# Altium PCB Commodore CPM Modul.PcbDoc (part 2 of 2)
Units mm, origin at the board's own origin, x right, y up, seen from the top; angles counter-clockwise.
Board outline 105.5 x 129.25 mm, 2 copper layers (Top Layer, Bottom Layer), stack 1.569 mm thick; 51 components, 93 nets, 364 pads, 127 vias.
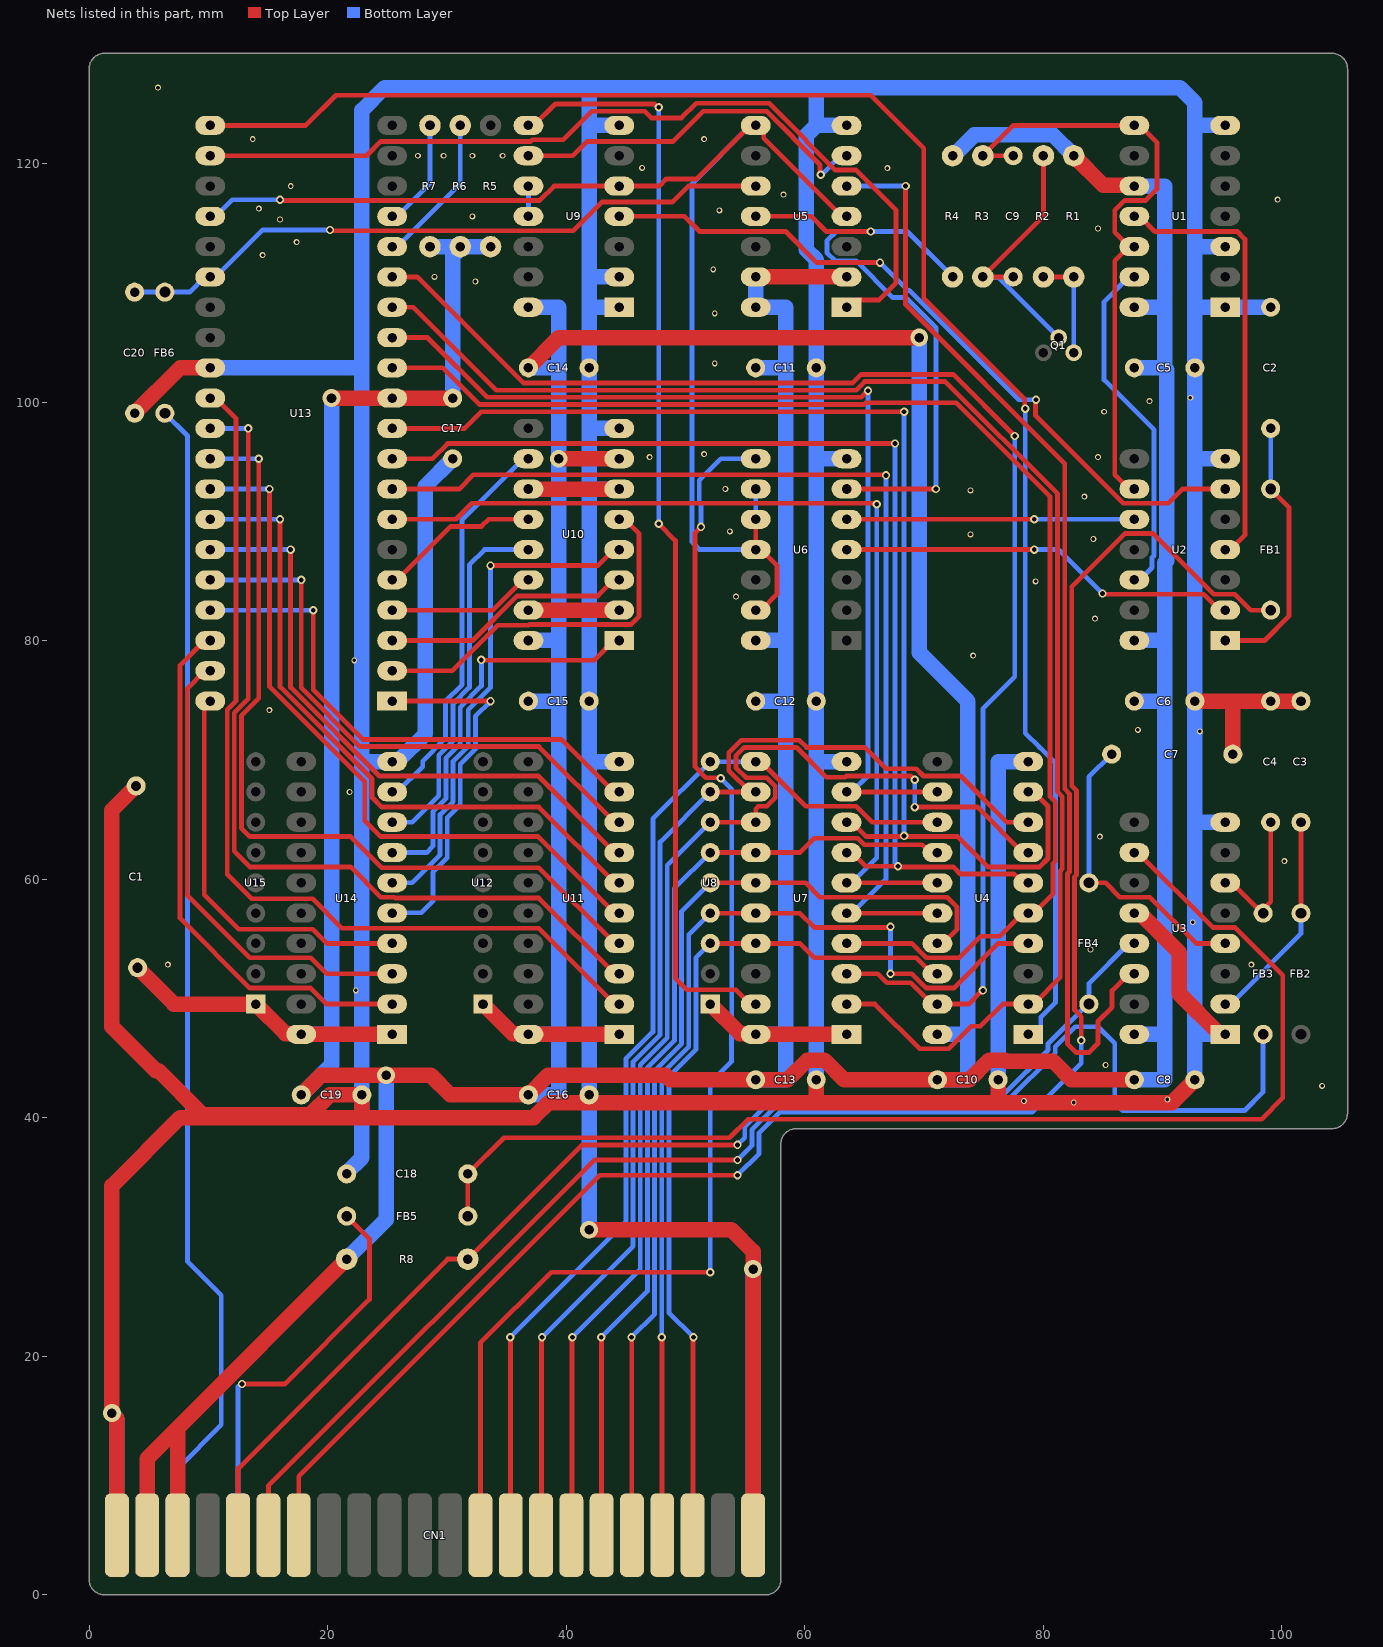
[diagram p2: the nets of this part, all layers, seen from the top]

## Via types
v1: diameter 0.7, hole 0.4, Top Layer to Bottom Layer, tented both sides, 63 vias
v2: diameter 0.5, hole 0.3, Top Layer to Bottom Layer, tented both sides, 57 vias
v3: diameter 1.5, hole 0.8, Top Layer to Bottom Layer, tented both sides, 7 vias

## Nets (pads, with @x,y where several pads share a name; then routed paths per layer and width w, separated by ;. In a path a pad name is that pad's centre, name@x,y a point inside that pad or via, vN(x,y) a via of type N, cw(c..) or ccw(c..) an arc to the next point about the centre after c; other vN are vias at no path point) (continued)
D1: CN1.20 U4.18 U7.17 U8.3 | length 72
  Top Layer w0.4: CN1.20@50.589,5 50.631,5.042 50.631,21.548 v1(50.673,21.59) ; U8.3@52.07,54.61 U7.17@55.88,54.61 59.592,54.61 60.792,53.41 69.324,53.41 69.924,52.81 69.93,52.81 70.67,52.07 U4.18@71.12,52.07
  Bottom Layer w0.4: v1(50.673,21.59) 48.606,23.657 48.606,43.439 50.87,45.703 50.87,53.41 U8.3@52.07,54.61
D2: CN1.19 U4.4 U7.16 U8.4 | length 87
  Top Layer w0.4: v1(48.006,21.59) 48.028,21.568 48.028,5.022 CN1.19@48.049,5 ; U8.4@52.07,57.15 U7.16@55.88,57.15 59.592,57.15 60.792,55.95 67.126,55.95 v1(67.183,56.007) ; v1(67.183,52.07) 68.973,52.07 70.173,50.87 72.488,50.87 76.228,54.61 U4.4@78.74,54.61
  Bottom Layer w0.4: v1(48.006,21.59) 48.006,43.688 50.27,45.952 50.27,55.35 U8.4@52.07,57.15 ; v1(67.183,52.07) v1(67.183,56.007)
D3: CN1.18 U4.17 U7.15 U8.5 | length 83
  Top Layer w0.4: v1(45.466,21.59) 45.488,21.568 45.488,5.022 CN1.18@45.509,5 ; U8.5@52.07,59.69 U7.15@55.88,59.69 60.066,59.69 61.266,58.49 71.927,58.49 72.77,57.647 72.77,55.81 71.57,54.61 U4.17@71.12,54.61
  Bottom Layer w0.4: v1(45.466,21.59) 47.406,23.53 47.406,43.936 49.67,46.2 49.67,57.29 U8.5@52.07,59.69
D4: CN1.17 U4.14 U7.14 U8.6 | length 81.1
  Top Layer w0.4: v1(42.926,21.59) 42.948,21.568 42.948,5.022 CN1.17@42.969,5 ; U8.6@52.07,62.23 U7.14@55.88,62.23 59.592,62.23 60.792,63.43 64.447,63.43 65,62.877 69.836,62.877 70.483,62.23 U4.14@71.12,62.23
  Bottom Layer w0.4: v1(42.926,21.59) 46.806,25.47 46.806,44.185 49.07,46.449 49.07,59.23 U8.6@52.07,62.23
D5: CN1.16 U4.7 U7.13 U8.7 | length 107.4
  Top Layer w0.4: CN1.16@40.429,5 40.471,5.042 40.471,21.548 v1(40.513,21.59) ; U8.7@52.07,64.77 U7.13@55.88,64.77 55.88,65.876 56.114,66.11 56.827,66.11 57.53,66.813 57.53,67.807 56.827,68.51 55.073,68.51 54.23,69.353 54.23,70.347 54.933,71.05 59.304,71.05 61.812,68.543 63.393,68.543 63.5,68.65 68.891,68.65 v1(69.215,68.326) ; v1(69.215,66.04) 74.48,66.04 78.29,62.23 U4.7@78.74,62.23
  Bottom Layer w0.4: v1(40.513,21.59) 46.206,27.283 46.206,44.433 48.47,46.697 48.47,61.17 U8.7@52.07,64.77 ; v1(69.215,66.04) v1(69.215,68.326)
D6: CN1.15 U4.8 U7.12 U8.8 | length 104.4
  Top Layer w0.4: CN1.15@37.889,5 37.931,5.042 37.931,21.548 v1(37.973,21.59) ; U8.8@52.07,67.31 55.499,67.31 U7.12@55.88,67.31 ; U7.12@55.424,67.31 53.63,69.104 53.63,70.596 54.684,71.65 59.553,71.65 60.153,71.05 65.022,71.05 66.822,69.25 69.352,69.25 69.952,68.65 73.056,68.65 76.936,64.77 U4.8@78.74,64.77
  Bottom Layer w0.4: v1(37.973,21.59) 45.606,29.223 45.606,44.682 47.87,46.946 47.87,63.11 U8.8@52.07,67.31
D7: CN1.14 U4.13 U7.11 U8.9 | length 93
  Top Layer w0.4: v1(35.306,21.59) 35.328,21.568 35.328,5.022 CN1.14@35.349,5 ; U7.11@55.88,69.85 56.33,69.85 57.07,69.11 57.076,69.11 60.076,66.11 64.307,66.11 65.647,64.77 U4.13@71.12,64.77
  Bottom Layer w0.4: v1(35.306,21.59) 45.006,31.29 45.006,44.93 47.27,47.194 47.27,65.05 U8.9@52.07,69.85 U7.11@55.88,69.85
D\M\A\: CN1.13 U6.8 | length 112.7
  Top Layer w0.4: CN1.13@32.809,5 32.809,21.125 38.735,27.051 v1(52.07,27.051) ; v1(51.296,89.535) 50.8,89.039 50.8,69.423 51.713,68.51 52.902,68.51 v1(52.959,68.453)
  Bottom Layer w0.4: v1(51.296,89.535) 51.296,91.452 51.146,91.602 51.146,93.437 52.959,95.25 U6.8@55.88,95.25 ; v1(52.07,27.051) 52.07,42.926 53.848,44.704 53.848,46.984 53.87,47.006 53.87,67.542 v1(52.959,68.453)
DATA_DIR_OE: U7.19 U9.8 | length 93
  Top Layer w0.4: U9.8@36.83,123.19 37.28,123.19 39.08,124.99 47.395,124.99 47.671,124.714 v1(47.752,124.714) ; v1(47.752,89.789) 49.149,88.392 49.149,51.689 50.108,50.73 54.23,50.73 55.43,49.53 U7.19@55.88,49.53
  Bottom Layer w0.4: v1(47.752,89.789) v1(47.752,124.714)
"DOT Clk": CN1.6 FB3.1 | length 115.8
  Top Layer w0.4: CN1.6@15.029,5 15.029,9.137 42.341,36.449 v1(54.356,36.449)
  Bottom Layer w0.4: v1(54.356,36.449) 55.569,37.662 55.569,38.978 57.647,41.056 76.108,41.056 76.432,41.38 76.946,41.38 80.99,45.424 80.99,45.938 82.677,47.625 84.582,47.625 85.979,46.228 85.979,41.275 86.649,40.605 96.866,40.605 98.425,42.164 FB3.1@98.425,46.99
GND: C1.2 C2.1 C3.2 C4.2 C5.1 C6.1 C7.1 C8.1 C10.1 C11.1 C12.1 C13.1 C14.1 C15.1 C16.1 C17.1 C18.1 C19.1 C20.1 CN1.1 CN1.22 CN1.A CN1.Z U1.1 U1.3 U1.7 U2.7 U3.1 U3.8 U3.12 U4.10 U5.7 U6.7 U7.10 U9.1 U9.2 U9.7 U10.2 U10.6 U10.8 U10.11 U10.15 U11.10 U13.29 U14.10 | length 836
  Top Layer w1.3: v3@1.905,15.186 1.905,34.29 7.62,40.005 22.86,40.005 ; CN1.1@2.329,5 v3@2.329,14.762 ; C20.1@3.81,99.06 7.62,102.87 U13.29@10.16,102.87 ; C1.2@3.937,67.818 1.905,65.786 1.905,47.625 5.587,43.943 5.804,43.943 9.486,40.26 18.529,40.26 20.179,41.91 C19.1@22.86,41.91 22.86,40.005 ; U10.15@36.83,82.55 U10.2@44.45,82.55 ; U10.11@36.83,92.71 U10.6@44.45,92.71 ; v3(41.91,30.607) 53.848,30.607 55.669,28.786 v3(55.669,27.305) CN1.22@55.669,5 ; C16.1@41.91,41.91 C16.1@41.91,41.275 ; C13.1@60.96,43.18 60.96,41.275 ; C10.1@76.2,43.18 76.2,41.275 ; U3.12@87.63,57.15 88.08,57.15 91.394,53.836 91.394,50.396 94.8,46.99 U3.1@95.25,46.99 ; C8.1@92.71,43.18 90.805,41.275 76.2,41.275 ; C6.1@92.71,74.93 96.012,74.93 ; C7.1@95.885,70.485 95.885,74.803 96.012,74.93 ; C3.2@101.6,74.93 C4.2@99.06,74.93 96.012,74.93 ; 22.86,40.005 37.258,40.005 38.528,41.275 C16.1@41.91,41.275 ; C16.1@41.91,41.275 60.96,41.275 ; 60.96,41.275 76.2,41.275
  Bottom Layer w1.3: v3(1.905,15.24) 1.905,15.186 2.329,14.762 CN1.A@2.329,5 ; U13.29@10.16,102.87 22.86,102.87 ; C18.1@21.59,35.288 21.59,35.369 22.86,36.639 C19.1@22.86,41.91 22.86,69.85 ; C17.1@30.48,95.25 28.185,92.955 28.185,72.185 25.948,69.948 25.498,69.948 U14.10@25.4,69.85 22.86,69.85 ; v3(41.91,30.607) C16.1@41.91,41.91 41.91,69.85 ; U11.10@44.45,69.85 41.91,69.85 ; U10.2@44.45,82.55 41.91,82.55 ; U10.6@44.45,92.71 41.91,92.71 ; U10.8@44.45,97.79 41.91,97.79 ; U9.1@44.45,107.95 41.91,107.95 ; U9.2@44.45,110.49 41.91,110.49 ; U9.7@44.45,123.19 41.91,123.19 ; CN1.Z@55.669,5 v3(55.669,27.305) ; C13.1@60.96,43.18 60.96,69.85 ; U7.10@63.5,69.85 60.96,69.85 ; U6.7@63.5,95.25 60.96,95.25 ; U5.7@63.5,123.19 60.96,123.19 ; C10.1@76.2,43.18 76.2,69.85 U4.10@78.74,69.85 ; C8.1@92.71,43.18 92.71,46.99 ; U3.1@95.25,46.99 92.71,46.99 ; U3.8@95.25,64.77 92.71,64.77 ; U2.7@95.25,95.25 92.837,95.25 92.71,95.123 ; U1.3@95.25,113.03 92.837,113.03 92.71,113.157 ; U1.7@95.25,123.19 92.71,123.19 ; C2.1@99.06,107.95 U1.1@95.25,107.95 92.71,107.95 ; 22.86,69.85 22.86,102.87 ; 22.86,102.87 22.86,124.46 24.765,126.365 41.91,126.365 ; 41.91,69.85 C15.1@41.91,74.93 41.91,82.55 ; 41.91,82.55 41.91,92.71 ; 41.91,92.71 41.91,97.79 ; 41.91,97.79 C14.1@41.91,102.87 41.91,107.95 ; 41.91,107.95 41.91,110.49 ; 41.91,110.49 41.91,123.19 ; 41.91,123.19 41.91,126.365 ; 41.91,126.365 60.96,126.365 ; 60.96,69.85 C12.1@60.96,74.93 60.96,95.25 ; 60.96,95.25 C11.1@60.96,102.87 60.96,111.938 60.141,112.757 60.141,122.371 60.96,123.19 ; 60.96,123.19 60.96,126.365 ; 60.96,126.365 91.44,126.365 92.71,125.095 92.71,123.19 ; 92.71,46.99 92.71,64.77 ; 92.71,64.77 C6.1@92.71,74.93 92.71,95.123 ; 92.71,95.123 C5.1@92.71,102.87 92.71,107.95 ; 92.71,107.95 92.71,113.157 ; 92.71,113.157 92.71,123.19
  other v2: 82.55,41.275 78.359,41.402 90.392,41.529 103.378,42.672 85.217,44.421 22.352,50.673 6.604,52.832 97.435,52.832 83.952,54.106 92.526,56.388 100.203,61.517 84.739,63.57 21.844,67.31 93.117,72.39 87.918,72.517 15.113,74.168 22.225,78.343 74.11,78.74 84.328,81.837 54.229,83.693 79.345,84.961 84.201,88.519 73.89,88.9 53.721,89.154 83.439,92.075 73.89,92.601 53.34,92.71 46.99,95.377 84.582,95.377 51.562,95.631 85.09,99.187 88.9,100.076 92.329,100.361 52.451,103.251 52.451,107.442 32.385,110.109 28.956,110.49 52.324,111.125 14.547,112.317 17.399,113.411 84.582,114.554 16.002,115.309 32.131,115.57 52.832,116.078 14.224,116.217 99.643,116.967 58.216,117.397 16.903,118.11 66.929,119.61 46.355,119.634 27.559,120.65 29.718,120.65 32.131,120.65 34.671,120.65 13.716,122.047 51.562,122.047 5.772,126.365
I\/\O\1\: CN1.7 FB1.1 | length 147.5
  Top Layer w0.4: CN1.7@17.569,5 17.569,9.949 42.799,35.179 v1(54.356,35.179) ; v1(83.185,46.482) 83.185,48.468 82.62,49.033 82.62,60.187 82.79,60.357 82.79,67.416 82.388,67.818 82.388,84.535 86.823,88.97 89.223,88.97 94.303,83.89 96.057,83.89 97.397,82.55 FB1.1@99.06,82.55
  Bottom Layer w0.4: v1(54.356,35.179) 56.169,36.992 56.169,38.73 57.895,40.456 79.064,40.456 83.185,44.577 v1(83.185,46.482)
I\N\T\: R6.2 U13.16 | length 12.8
  Bottom Layer w0.4: U13.16@25.4,113.03 25.85,113.03 31.115,118.295 R6.2@31.115,123.19
L_A0: U11.2 U13.30 | length 78.8
  Top Layer w0.4: U13.30@10.16,100.33 10.61,100.33 12.319,98.621 12.319,74.942 11.57,74.193 11.57,60.393 13.613,58.35 18.727,58.35 21.197,55.88 37.707,55.88 44.057,49.53 U11.2@44.45,49.53
L_A1: U11.3 U13.31 | length 75.6
  Top Layer w0.4: v1(13.335,97.79) 13.335,75.109 12.17,73.944 12.17,62.333 13.473,61.03 21.913,61.03 24.453,58.49 25.584,58.49 25.654,58.42 37.707,58.42 44.057,52.07 U11.3@44.45,52.07
  Bottom Layer w0.4: U13.31@10.16,97.79 v1(13.335,97.79)
L_A2: U11.4 U13.32 | length 71.3
  Top Layer w0.4: v1(14.224,95.25) 14.224,75.15 12.77,73.696 12.77,64.273 13.473,63.57 21.913,63.57 24.523,60.96 37.707,60.96 44.057,54.61 U11.4@44.45,54.61
  Bottom Layer w0.4: U13.32@10.16,95.25 v1(14.224,95.25)
L_A3: U11.5 U13.33 | length 60.6
  Top Layer w0.4: v1(15.113,92.71) 15.113,76.154 23.114,68.153 23.114,64.909 24.453,63.57 37.637,63.57 44.057,57.15 U11.5@44.45,57.15
  Bottom Layer w0.4: U13.33@10.16,92.71 v1(15.113,92.71)
L_A4: U11.6 U13.34 | length 56.1
  Top Layer w0.4: v1(16.002,90.17) 16.002,76.113 23.714,68.401 23.714,66.849 24.523,66.04 37.707,66.04 44.057,59.69 U11.6@44.45,59.69
  Bottom Layer w0.4: U13.34@10.16,90.17 v1(16.002,90.17)
L_A5: U11.7 U13.35 | length 51.6
  Top Layer w0.4: v1(16.891,87.63) 16.891,76.073 24.314,68.65 37.637,68.65 44.057,62.23 U11.7@44.45,62.23
  Bottom Layer w0.4: U13.35@10.16,87.63 v1(16.891,87.63)
L_A6: U11.8 U13.36 | length 48
  Top Layer w0.4: v1(17.78,85.09) 17.78,76.033 22.693,71.12 37.707,71.12 44.057,64.77 U11.8@44.45,64.77
  Bottom Layer w0.4: U13.36@10.16,85.09 v1(17.78,85.09)
L_A7: U11.9 U13.37 | length 44.5
  Top Layer w0.4: v1(18.796,82.55) 18.796,75.865 22.941,71.72 39.59,71.72 44,67.31 U11.9@44.45,67.31
  Bottom Layer w0.4: U13.37@10.16,82.55 v1(18.796,82.55)
L_A8: U13.38 U14.2 | length 45.4
  Top Layer w0.4: U13.38@10.16,80.01 9.71,80.01 7.62,77.92 7.62,56.723 13.473,50.87 18.587,50.87 19.927,49.53 U14.2@25.4,49.53
L_A9: U13.39 U14.3 | length 39.8
  Top Layer w0.4: U13.39@10.16,77.47 9.71,77.47 8.22,75.98 8.22,58.663 13.473,53.41 18.587,53.41 19.927,52.07 U14.3@25.4,52.07
L_A10: U13.40 U14.4 | length 33.9
  Top Layer w0.4: U13.40@10.16,74.93 9.652,74.422 9.652,58.704 12.546,55.81 18.727,55.81 19.257,55.28 19.927,54.61 U14.4@25.4,54.61
L_A11: U13.1 U14.5 | length 30.9
  Top Layer w0.4: U13.1@25.4,74.93 v1(33.655,74.93)
  Bottom Layer w0.4: U14.5@25.4,57.15 25.43,57.18 27.855,57.18 28.82,58.144 28.82,60.581 30.02,61.781 30.02,65.164 31.115,66.259 31.115,69.642 32.385,70.912 32.385,73.66 v1(33.655,74.93)
L_A12: U10.5 U13.2 | length 31.7
  Top Layer w0.4: U13.2@25.4,77.47 30.451,77.47 34.261,81.28 36.83,81.28 36.9,81.35 45.397,81.35 46.101,82.054 46.101,88.969 44.9,90.17 U10.5@44.45,90.17
L_A13: U10.3 U13.3 | length 21.2
  Top Layer w0.4: U13.3@25.4,80.01 32.143,80.01 35.883,83.75 42.66,83.75 44,85.09 U10.3@44.45,85.09
L_A14: U10.14 U13.4 | length 12.5
  Top Layer w0.4: U13.4@25.4,82.55 33.834,82.55 35.634,84.35 35.64,84.35 36.38,85.09 U10.14@36.83,85.09
L_A15: U10.12 U13.5 | length 13.5
  Top Layer w0.4: U13.5@25.4,85.09 25.85,85.09 30.33,89.57 32.893,89.57 33.493,90.17 U10.12@36.83,90.17
L_D0: U4.2 U7.2 U13.14 | length 125.6
  Top Layer w0.4: U13.14@25.4,107.95 27.178,107.95 34.128,101 64.297,101 65.012,101.715 71.767,101.715 81.188,92.294 81.188,67.321 81.59,66.919 81.59,60.854 81.42,60.684 81.42,51.76 79.19,49.53 76.599,49.53 74.729,47.66 73.937,47.66 72.067,45.79 69.619,45.79 65.879,49.53 U7.2@63.5,49.53
L_D1: U4.19 U7.3 U13.15 | length 118.9
  Top Layer w0.4: U13.15@25.4,110.49 27.513,110.49 36.403,101.6 64.008,101.6 64.723,102.315 72.437,102.315 77.597,97.155 v1(77.609,97.155) ; U7.3@63.5,52.07 66.122,52.07 66.872,51.32 68.874,51.32 69.924,50.27 69.93,50.27 70.67,49.53 U4.19@71.12,49.53 73.752,49.53 74.768,50.546 74.803,50.546 v1(74.93,50.673)
  Bottom Layer w0.4: v1(74.93,50.673) 74.93,74.295 77.609,76.974 v1(77.609,97.155)
L_D2: U4.5 U7.4 U13.12 | length 113.3
  Top Layer w0.4: U13.12@25.4,102.87 29.637,102.87 32.707,99.8 64.962,99.8 65.099,99.937 72.696,99.937 80.566,92.067 80.566,66.902 80.99,66.478 80.99,61.484 80.82,61.314 80.82,58.78 79.19,57.15 78.29,57.15 76.35,55.21 74.751,55.21 72.951,53.41 70.173,53.41 68.973,54.61 U7.4@63.5,54.61
L_D3: U4.16 U7.5 U13.8 | length 87.9
  Top Layer w0.4: U13.8@25.4,92.71 31.017,92.71 32.217,93.91 66.745,93.91 v1(66.802,93.853) ; U7.5@63.5,57.15 U4.16@71.12,57.15
  Bottom Layer w0.4: U7.5@63.5,57.15 63.95,57.15 66.802,60.002 v1(66.802,93.853)
L_D4: U4.15 U7.6 U13.7 | length 81.9
  Top Layer w0.4: U13.7@25.4,90.17 30.757,90.17 32.097,91.51 65.97,91.51 v1(66.04,91.44) ; U7.6@63.5,59.69 U4.15@71.12,59.69
  Bottom Layer w0.4: U7.6@63.5,59.69 63.95,59.69 66.04,61.78 v1(66.04,91.44)
L_D5: U4.6 U7.7 U13.9 | length 94.5
  Top Layer w0.4: U13.9@25.4,95.25 28.783,95.25 30.053,96.52 v1(67.564,96.52) ; U7.7@63.5,62.23 63.95,62.23 65.093,61.087 67.761,61.087 67.818,61.03 72.453,61.03 73.053,60.43 77.55,60.43 78.29,59.69 U4.6@78.74,59.69
  Bottom Layer w0.4: v1(67.564,96.52) 67.564,61.341 v1(67.818,61.087)
L_D6: U4.9 U7.8 U13.10 | length 104.3
  Top Layer w0.4: U13.10@25.4,97.79 31.49,97.79 32.887,99.187 v1(68.326,99.187) ; U7.8@63.5,64.77 63.956,64.77 65.156,63.57 72.806,63.57 75.346,61.03 79.687,61.03 80.39,61.733 80.39,66.11 79.19,67.31 U4.9@78.74,67.31
  Bottom Layer w0.4: v1(68.326,63.627) v1(68.326,99.187)
L_D7: U4.12 U7.9 U13.13 | length 84.5
  Top Layer w0.4: U13.13@25.4,105.41 28.367,105.41 33.377,100.4 64.713,100.4 65.256,100.943 v1(65.3,100.943) ; U7.9@63.5,67.31 U4.12@71.12,67.31
  Bottom Layer w0.4: U7.9@63.5,67.31 63.95,67.31 65.29,68.65 65.29,100.932 v1(65.3,100.943)
N\M\I\: R7.2 U13.17 | length 9.2
  Bottom Layer w0.4: U13.17@25.4,115.57 25.85,115.57 28.575,118.295 R7.2@28.575,123.19
NetC2_2: C2.2 FB1.2 U2.1 | length 22.6
  Top Layer w0.4: U2.1@95.25,80.01 98.552,80.01 100.584,82.042 100.584,91.186 FB1.2@99.06,92.71
  Bottom Layer w0.4: FB1.2@99.06,92.71 C2.2@99.06,97.79
NetC3_1: C3.1 FB2.2 U3.2 | length 18.1
  Top Layer w0.4: FB2.2@101.6,57.15 C3.1@101.6,64.77
  Bottom Layer w0.4: U3.2@95.25,49.53 95.7,49.53 101.6,55.43 FB2.2@101.6,57.15
NetC4_1: C4.1 FB3.2 U3.6 | length 12.1
  Top Layer w0.4: U3.6@95.25,59.69 95.792,59.69 98.332,57.15 FB3.2@98.425,57.15 98.425,57.475 99.06,58.11 C4.1@99.06,64.77
NetC7_2: C7.2 FB4.2 U3.4 | length 25.1
  Top Layer w0.4: FB4.2@83.82,59.69 85.224,59.69 86.424,58.49 88.934,58.49 92.814,54.61 U3.4@95.25,54.61
  Bottom Layer w0.4: FB4.2@83.82,59.69 83.82,68.58 C7.2@85.725,70.485
NetC9_1: C9.1 R3.2 U1.8 U1.12 U2.9 | length 52.7
  Top Layer w0.4: C9.1@77.47,120.65 R3.2@74.93,120.65 77.47,123.19 U1.8@87.63,123.19 88.08,123.19 89.535,121.735 89.535,117.868 88.577,116.91 86.823,116.91 85.98,116.067 85.98,114.23 U1.12@87.18,113.03 ; U2.9@87.63,92.71 87.18,92.71 85.98,93.91 85.98,111.83 U1.12@87.18,113.03 ; U1.12@87.63,113.03 U1.12@87.18,113.03
NetC9_2: C9.2 Q1.2 R2.2 R3.1 | length 23.3
  Top Layer w0.4: C9.2@77.47,110.49 R3.1@74.93,110.49 80.01,115.57 R2.2@80.01,120.65
  Bottom Layer w0.4: R3.1@74.93,110.49 75,110.42 76.27,110.42 Q1.2@81.28,105.41
NetC18_2: C18.2 FB5.2 U3.10 | length 101.5
  Top Layer w0.4: FB5.2@31.75,31.75 C18.2@31.75,35.288 34.781,38.319 53.686,38.319 55.245,39.878 98.298,39.878 100.076,41.656 100.076,51.931 96.057,55.95 94.204,55.95 87.924,62.23 U3.10@87.63,62.23
NetQ1_3: Q1.3 R1.1 R2.1 | length 8.9
  Top Layer w0.4: R2.1@80.01,110.49 R1.1@82.55,110.49
  Bottom Layer w0.4: Q1.3@82.55,104.14 R1.1@82.55,110.49
NetR4_1: R4.1 U5.11 U6.6 | length 56.4
  Top Layer w0.4: U5.11@55.88,115.57 60.533,115.57 61.803,114.3 v1(65.532,114.3) ; U6.6@63.5,92.71 v1(70.993,92.71)
  Bottom Layer w0.4: v1(70.993,92.71) 70.993,106.281 68.51,108.764 67.373,108.764 64.307,111.83 62.553,111.83 61.85,112.533 61.85,113.527 62.623,114.3 v1(65.532,114.3) 68.58,114.3 R4.1@72.39,110.49
NetU1_11: U1.11 U2.4 | length 37
  Top Layer w0.4: U1.11@87.63,115.57 88.08,115.57 89.35,114.3 96.266,114.3 96.9,113.666 96.9,88.83 95.7,87.63 U2.4@95.25,87.63
NetU1_13: U1.13 U2.12 | length 29.4
  Bottom Layer w0.4: U2.12@87.63,85.09 88.08,85.09 89.12,86.13 89.12,86.973 89.281,87.134 89.281,97.663 85.09,101.854 85.09,108.4 87.18,110.49 U1.13@87.63,110.49
NetU2_2: U2.2 U6.4 | length 33.9
  Top Layer w0.4: U6.4@63.5,87.63 v1(79.236,87.63) ; v1(84.963,83.947) 85.02,83.89 93.454,83.89 94.794,82.55 U2.2@95.25,82.55
  Bottom Layer w0.4: v1(79.236,87.63) 81.28,87.63 v1(84.963,83.947)
NetU2_6: U2.6 U9.4 | length 62.1
  Top Layer w0.4: U9.4@44.45,115.57 49.905,115.57 51.175,114.3 58.385,114.3 60.995,111.69 v1(66.306,111.69) ; v1(79.386,100.203) 79.346,100.163 79.346,98.847 86.683,91.51 90.465,91.51 91.665,92.71 U2.6@95.25,92.71
  Bottom Layer w0.4: v1(66.306,111.69) 68.632,109.364 68.759,109.364 77.92,100.203 v1(79.386,100.203)
NetU2_10: U2.10 U6.5 | length 24.1
  Top Layer w0.4: U6.5@63.5,90.17 v1(79.236,90.17)
  Bottom Layer w0.4: v1(79.236,90.17) U2.10@87.63,90.17
NetU3_14: U3.14 U5.5 | length 93.2
  Top Layer w0.4: v1(68.453,118.11) 68.453,108.179 81.788,94.844 81.788,67.569 82.19,67.167 82.19,60.606 82.02,60.436 82.02,46.195 82.749,45.466 83.82,45.466 84.582,46.228 84.582,48.075 85.766,49.259 85.766,50.656 87.18,52.07 U3.14@87.63,52.07
  Bottom Layer w0.4: U5.5@63.5,118.11 v1(68.453,118.11)
NetU5_6: U5.6 U9.9 | length 31.6
  Top Layer w0.4: U9.9@36.83,120.65 40.542,120.65 41.742,121.85 48.958,121.85 51.498,124.39 56.827,124.39 59.053,122.164 59.053,122.101 61.279,119.875 61.279,119.223 61.341,119.162 v1(61.341,119.064)
  Bottom Layer w0.4: v1(61.341,119.064) 61.403,119.064 62.988,120.65 U5.6@63.5,120.65
NetU9_10: U9.10 U9.11 | length 2.5
  Bottom Layer w0.4: U9.11@36.83,115.57 U9.10@36.83,118.11
NetU10_1: U10.1 U14.7 | length 33.2
  Top Layer w0.4: v1(32.871,78.381) 32.893,78.359 42.349,78.359 44,80.01 U10.1@44.45,80.01
  Bottom Layer w0.4: U14.7@25.4,62.23 28.291,62.23 28.82,62.759 28.82,65.661 29.915,66.756 29.915,70.139 31.115,71.339 31.115,74.422 32.893,76.2 32.893,78.359 v1(32.871,78.381)
NetU10_4: U10.4 U14.6 | length 42.4
  Top Layer w0.4: v1(33.655,86.29) 42.66,86.29 44,87.63 U10.4@44.45,87.63
  Bottom Layer w0.4: U14.6@25.4,59.69 27.09,59.69 28.22,60.82 28.22,60.83 29.42,62.03 29.42,65.413 30.515,66.508 30.515,69.891 31.785,71.161 31.785,74.203 33.655,76.073 v1(33.655,86.29)
NetU10_10: U10.10 U14.9 | length 33.2
  Bottom Layer w0.4: U14.9@25.4,67.31 25.85,67.31 27.977,69.437 27.977,69.898 29.874,71.796 29.874,74.919 31.262,76.307 31.262,90.132 36.38,95.25 U10.10@36.83,95.25
NetU10_13: U10.13 U14.8 | length 30.7
  Bottom Layer w0.4: U14.8@25.4,64.77 27.09,64.77 28.062,65.742 28.062,65.752 29.315,67.005 29.315,70.388 30.515,71.588 30.515,74.711 31.877,76.073 31.877,86.36 33.147,87.63 U10.13@36.83,87.63
Phi2: CN1.E FB5.1 | length 34.3
  Top Layer w0.4: v1(12.812,17.668) 16.398,17.668 23.495,24.765 23.495,29.845 FB5.1@21.59,31.75
  Bottom Layer w0.4: CN1.E@12.489,5 12.489,17.488 12.55,17.488 12.73,17.668 v1(12.812,17.668)
R/W\: CN1.5 FB4.1 R8.2 U3.13 | length 100.8
  Top Layer w0.4: CN1.5@12.489,5 12.489,10.584 30.049,28.144 R8.2@31.75,28.144 41.325,37.719 v1(54.356,37.719) ; U3.13@87.18,54.61 U3.13@87.63,54.61
  Bottom Layer w0.4: v1(54.356,37.719) 54.969,38.332 54.969,39.227 57.398,41.656 75.859,41.656 76.183,41.98 76.697,41.98 80.39,45.673 80.39,46.187 83.733,49.53 FB4.1@83.82,49.53 83.82,51.25 U3.13@87.18,54.61
R\D\: U4.1 U13.21 | length 142.8
  Top Layer w0.4: U13.21@10.16,123.19 18.156,123.19 20.696,125.73 65.532,125.73 69.977,121.285 69.977,108.712 78.446,100.243 78.446,99.493 v1(78.486,99.453)
  Bottom Layer w0.4: v1(78.486,99.453) 78.486,72.251 79.687,71.05 81.026,69.711 81.026,49.669 79.79,48.433 79.79,47.59 79.19,46.99 U4.1@78.74,46.99
R\E\S\E\T\: CN1.C FB6.1 | length 97.5
  Bottom Layer w0.4: FB6.1@6.35,99.06 8.255,97.155 8.255,27.94 11.075,25.12 11.075,14.25 7.409,10.584 CN1.C@7.409,5
VCC: C1.1 C5.2 C6.2 C8.2 C10.2 C11.2 C12.2 C13.2 C14.2 C15.2 C16.2 C17.2 C19.2 CN1.2 CN1.3 R1.2 R4.2 R5.2 R6.1 R7.1 R8.1 U1.10 U1.14 U2.14 U3.16 U4.20 U5.2 U5.13 U5.14 U6.14 U7.1 U7.20 U8.1 U9.14 U10.7 U10.16 U11.1 U11.20 U12.1 U13.11 U14.1 U14.20 U15.1 | length 659.4
  Top Layer w1.3: C1.1@4.064,52.578 7.112,49.53 U15.1@13.97,49.53 16.453,47.047 17.723,47.047 U14.20@17.78,46.99 U14.1@25.4,46.99 ; CN1.2@4.869,5 4.869,11.423 7.409,13.963 ; CN1.3@7.409,5 7.409,13.963 ; C19.2@17.78,41.91 19.43,43.56 v3(24.892,43.56) 28.638,43.56 30.288,41.91 C16.2@36.83,41.91 38.48,43.56 48.323,43.56 48.703,43.18 58.561,43.18 60.211,44.83 61.643,44.83 63.293,43.18 C10.2@71.12,43.18 73.801,43.18 75.451,44.83 76.799,44.83 76.889,44.74 80.798,44.74 82.358,43.18 C8.2@87.63,43.18 ; v3(20.32,100.33) U13.11@25.4,100.33 C17.2@30.48,100.33 ; R8.1@21.59,28.144 7.409,13.963 ; U12.1@33.02,49.53 35.503,47.047 36.773,47.047 U11.20@36.83,46.99 U11.1@44.45,46.99 ; C14.2@36.83,102.87 39.37,105.41 v3(69.596,105.41) ; v3(39.37,95.25) U10.7@44.45,95.25 ; U8.1@52.07,49.53 54.553,47.047 55.823,47.047 U7.20@55.88,46.99 U7.1@63.5,46.99 ; U5.13@55.88,110.49 U5.2@63.5,110.49 ; R1.2@82.55,120.65 85.033,118.167 87.573,118.167 U1.10@87.63,118.11
  Bottom Layer w1.3: C19.2@17.78,41.91 20.32,44.45 20.32,46.99 ; U14.20@17.78,46.99 20.32,46.99 ; v3(20.32,100.33) 20.32,46.99 ; R8.1@21.59,28.144 24.892,31.446 v3(24.892,43.56) ; R7.1@28.575,113.03 R6.1@31.115,113.03 ; C17.2@30.48,100.33 30.48,112.26 31.115,112.895 R6.1@31.115,113.03 ; R5.2@33.655,113.03 R6.1@31.115,113.03 ; C16.2@36.83,41.91 39.37,41.91 39.37,46.99 ; U11.20@36.83,46.99 39.37,46.99 ; C15.2@36.83,74.93 39.37,74.93 ; U10.16@36.83,80.01 39.37,80.01 ; C14.2@36.83,102.87 39.37,102.87 ; U9.14@36.83,107.95 39.37,107.95 39.37,102.87 ; C13.2@55.88,43.18 58.42,43.18 58.42,46.99 ; U7.20@55.88,46.99 58.42,46.99 ; C12.2@55.88,74.93 58.42,74.93 ; U6.14@55.88,80.01 58.42,80.01 ; C11.2@55.88,102.87 58.42,102.87 ; U5.13@55.88,110.49 U5.14@55.88,107.95 58.42,107.95 58.42,102.87 ; v3(69.596,105.41) 69.596,78.994 73.66,74.93 73.66,46.99 ; C10.2@71.12,43.18 73.66,43.18 73.66,46.99 ; U4.20@71.12,46.99 73.66,46.99 ; R4.2@72.39,120.65 72.455,120.65 74.205,122.4 80.8,122.4 R1.2@82.55,120.65 ; C8.2@87.63,43.18 90.17,43.18 90.17,46.99 ; U3.16@87.63,46.99 90.17,46.99 ; C6.2@87.63,74.93 90.17,74.93 ; U2.14@87.63,80.01 90.17,80.01 ; C5.2@87.63,102.87 90.17,102.87 ; U1.14@87.63,107.95 90.17,107.95 ; U1.10@87.63,118.11 90.17,118.11 90.17,107.95 ; 39.37,46.99 39.37,74.93 ; 39.37,74.93 39.37,80.01 ; 39.37,80.01 v3(39.37,95.25) 39.37,102.87 ; 58.42,46.99 58.42,74.93 ; 58.42,74.93 58.42,80.01 ; 58.42,80.01 58.42,102.87 ; 90.17,46.99 90.17,74.93 ; 90.17,74.93 90.17,80.01 ; 90.17,80.01 90.17,86.538 90.331,86.699 90.331,102.709 90.17,102.87 ; 90.17,102.87 90.17,107.95
W\A\I\T\: U5.4 U5.8 U6.9 U6.10 U6.11 U6.13 U9.5 U13.24 | length 115.2
  Top Layer w0.4: v1(16.002,116.967) 16.059,116.91 37.777,116.91 38.977,118.11 U9.5@44.45,118.11 47.787,118.11 48.387,118.71 50.95,118.71 55.43,123.19 56.005,123.19 56.56,122.636 56.56,122.117 63.107,115.57 U5.4@63.5,115.57 ; U6.13@55.88,82.55 56.33,82.55 57.658,83.878 57.658,86.302 56.33,87.63 U6.11@55.88,87.63 U6.10@55.88,90.17
  Bottom Layer w0.4: U13.24@10.16,115.57 10.61,115.57 12.007,116.967 v1(16.002,116.967) ; U6.11@55.88,87.63 51.181,87.63 50.546,88.265 50.546,118.306 55.43,123.19 U5.8@55.88,123.19 ; U6.10@55.88,90.17 U6.9@55.88,92.71
W\R\: U5.1 U13.22 | length 74.6
  Top Layer w0.4: U13.22@10.16,120.65 23.253,120.65 24.453,121.85 37.014,121.85 37.154,121.99 39.729,121.99 42.129,124.39 46.581,124.39 47.146,123.825 49.657,123.825 50.892,125.06 51.4,125.06 57.006,125.06 60.131,121.935 60.131,121.872 62.553,119.45 64.301,119.45 64.441,119.31 64.447,119.31 67.656,116.101 67.656,111.257 67.656,109.993 66.213,108.55 64.949,108.55 64.1,108.55 U5.1@63.5,107.95
Z80-R\E\S\E\T\: C20.2 FB6.2 U5.10 U13.26 | length 55.8
  Top Layer w0.4: v1(20.193,114.427) 20.25,114.37 40.583,114.37 42.983,116.77 48.894,116.77 50.234,118.11 U5.10@55.88,118.11
  Bottom Layer w0.4: C20.2@3.81,109.22 FB6.2@6.35,109.22 8.44,109.22 9.71,110.49 U13.26@10.16,110.49 10.61,110.49 14.547,114.427 v1(20.193,114.427)
pads on no net: CN1.4 CN1.8 CN1.9 CN1.10 CN1.11 CN1.B CN1.D U1.2 U1.4 U1.5 U1.6 U1.9 U3.11 U5.9 U9.3 U10.9 U13.18 U13.19 U13.20 U13.27 U13.28

## Polygon pours and split planes (outlines as drawn)
GND on Top Layer "Top Layer - GND" (solid, remove dead copper, pour order 0): 0,1.27 ccw(c1.27,1.27) 1.27,0 56.728,0 ccw(c56.728,1.27) 57.998,1.27 57.998,37.809 cw(c59.269,37.809) 59.269,39.08 104.202,39.08 ccw(c104.202,40.378) 105.5,40.378 105.5,127.94 ccw(c104.19,127.94) 104.19,129.25 1.306,129.25 ccw(c1.306,127.944) 0,127.944
GND on Bottom Layer "Bottom Layer - GND" (solid, remove dead copper, pour order 1): 0,1.27 ccw(c1.27,1.27) 1.27,0 56.728,0 ccw(c56.728,1.27) 57.998,1.27 57.998,37.809 cw(c59.269,37.809) 59.269,39.08 104.202,39.08 ccw(c104.202,40.378) 105.5,40.378 105.5,127.94 ccw(c104.19,127.94) 104.19,129.25 1.306,129.25 ccw(c1.306,127.944) 0,127.944

## Keep-outs
Top Layer:
  region: 0,0 58.039,0 58.039,4.826 0,4.826
Bottom Layer:
  region: 0,0 58.039,0 58.039,4.826 0,4.826

## Other copper
Bottom Layer:
  text "FAB. NO. 326229 REV. B" at 101.368,82.012 h3 r270

## Silkscreen, mask and mechanical layers (free items; w line width, h text height)
Top Overlay:
  drawing of 12 lines, arcs and shapes, not listed
  text "JLCJLCJLCJLC" at 23.012,109.847 h1.2 r90
  text "CP/M Cartridge" at 8.974,22.031 h6
  text "ASSY.NO / 326232 /  / REV. B" at 36.01,10.264 h3
Bottom Overlay:
  drawing of 83 lines, arcs and shapes, not listed
  text "Version: '.Version' / Revision: '.Revision' / Date: 13.04.2020" at 56.134,13.773 h2
Board:
  circle w0.1: c17.619,30.16 r1.15
  circle w0.1: c6.347,21.748 r1.55
  circle w0.1: c6.506,120.65 r1.55
  circle w0.1: c99.53,123.349 r1.15
  circle w0.1: c4.601,83.344 r1.75
  circle w0.1: c74.451,83.344 r1.75
  lines w0.1: 0,1.27 ccw(c1.27,1.27) 1.27,0 56.728,0 ccw(c56.728,1.27) 57.998,1.27 57.998,37.809 cw(c59.269,37.809) 59.269,39.08 104.202,39.08 ccw(c104.202,40.378) 105.5,40.378 105.5,127.94 ccw(c104.19,127.94) 104.19,129.25 1.306,129.25 ccw(c1.306,127.944) 0,127.944 0,1.27

## Text inside footprints (layer, text, board x,y; h text height)
C1: Top Overlay "+" at 7.378,52.953 h4 r90; Top Assembly "+" at 7.378,52.953 h4 r90